# Altium PCB PCB1.PcbDoc
Units mm, origin at the board's own origin, x right, y up, seen from the top; angles counter-clockwise.
Board outline 61 x 70 mm, 2 copper layers (Top Layer, Bottom Layer); 89 components, 64 nets, 292 pads, 22 vias.
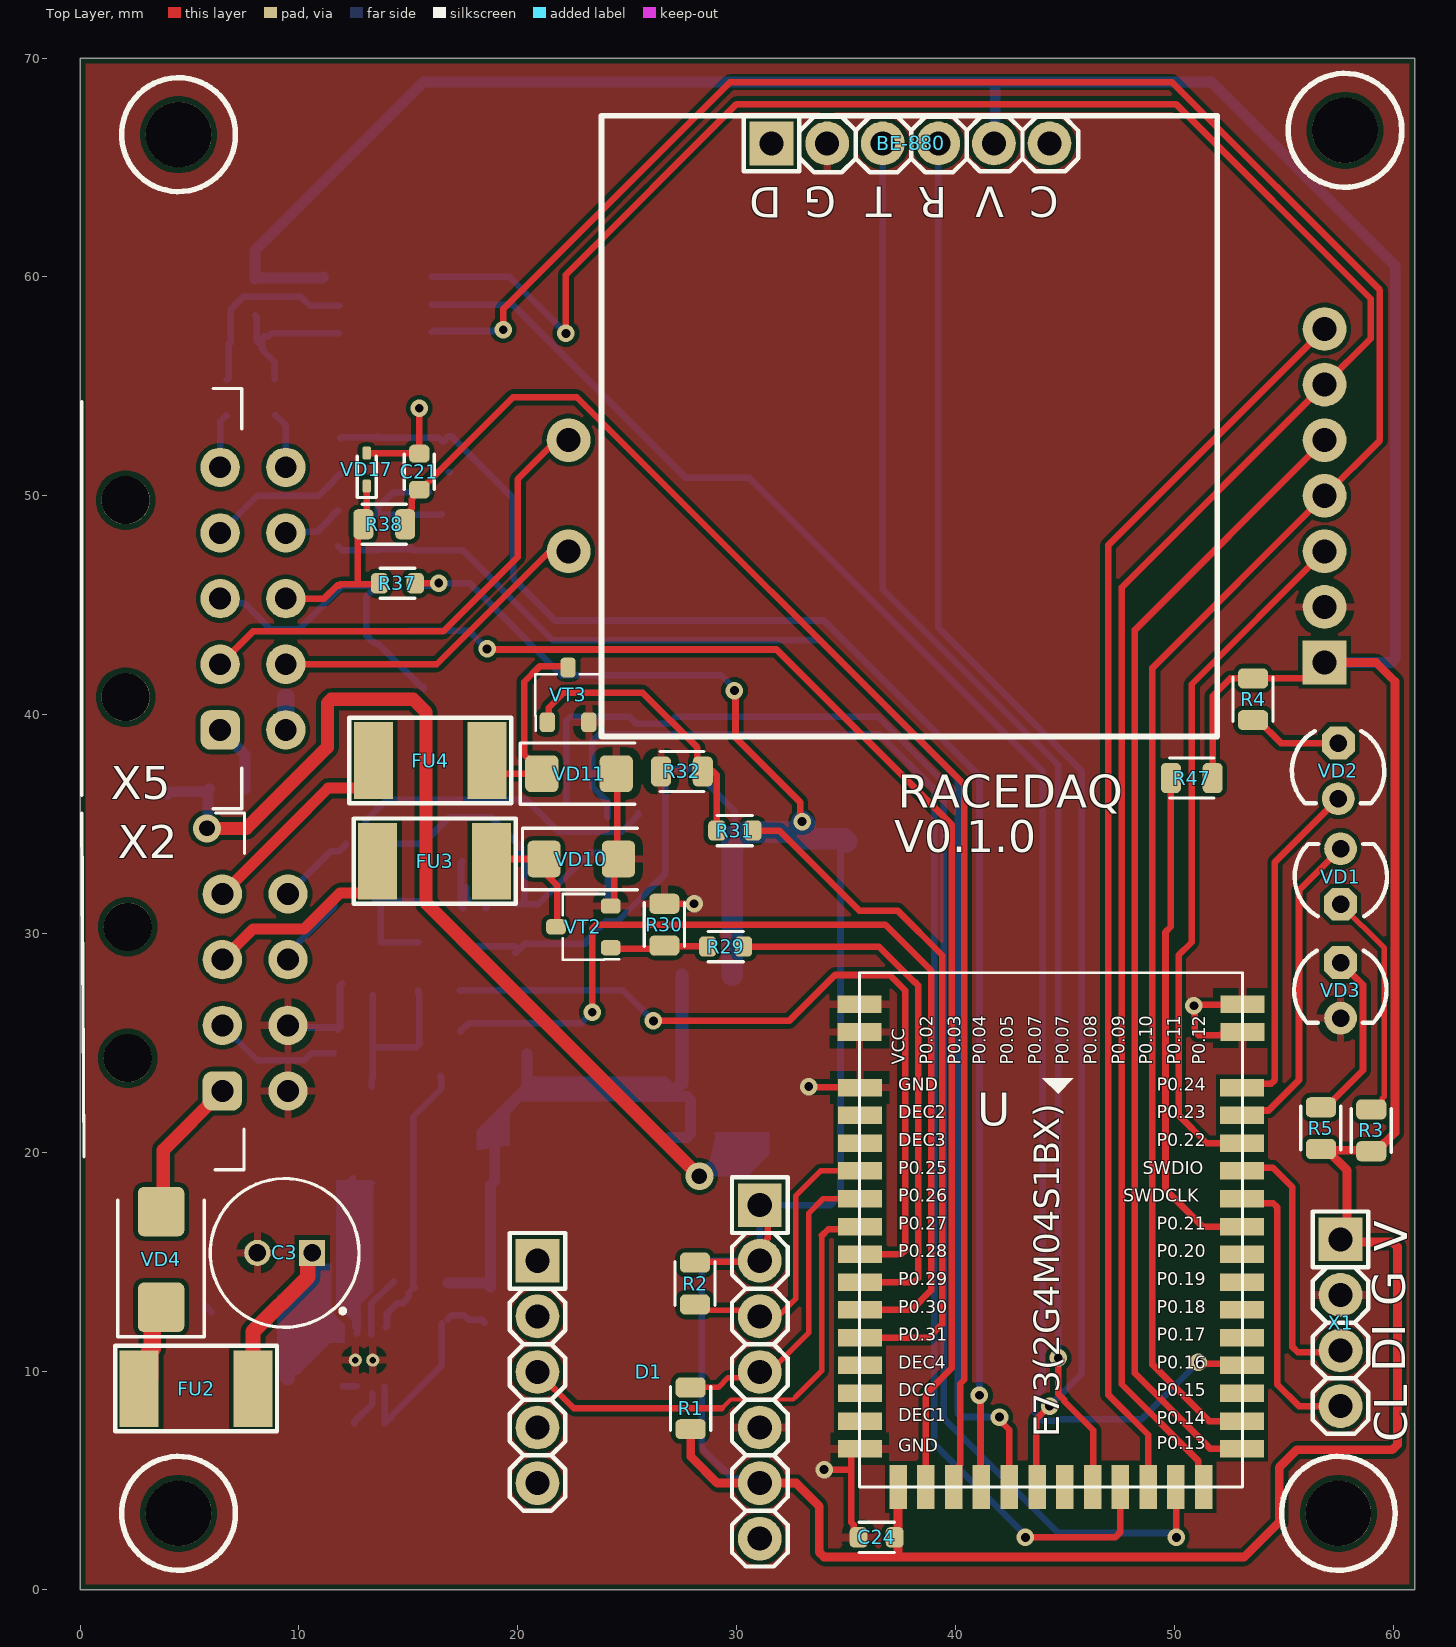
[diagram p0: Top Layer view]
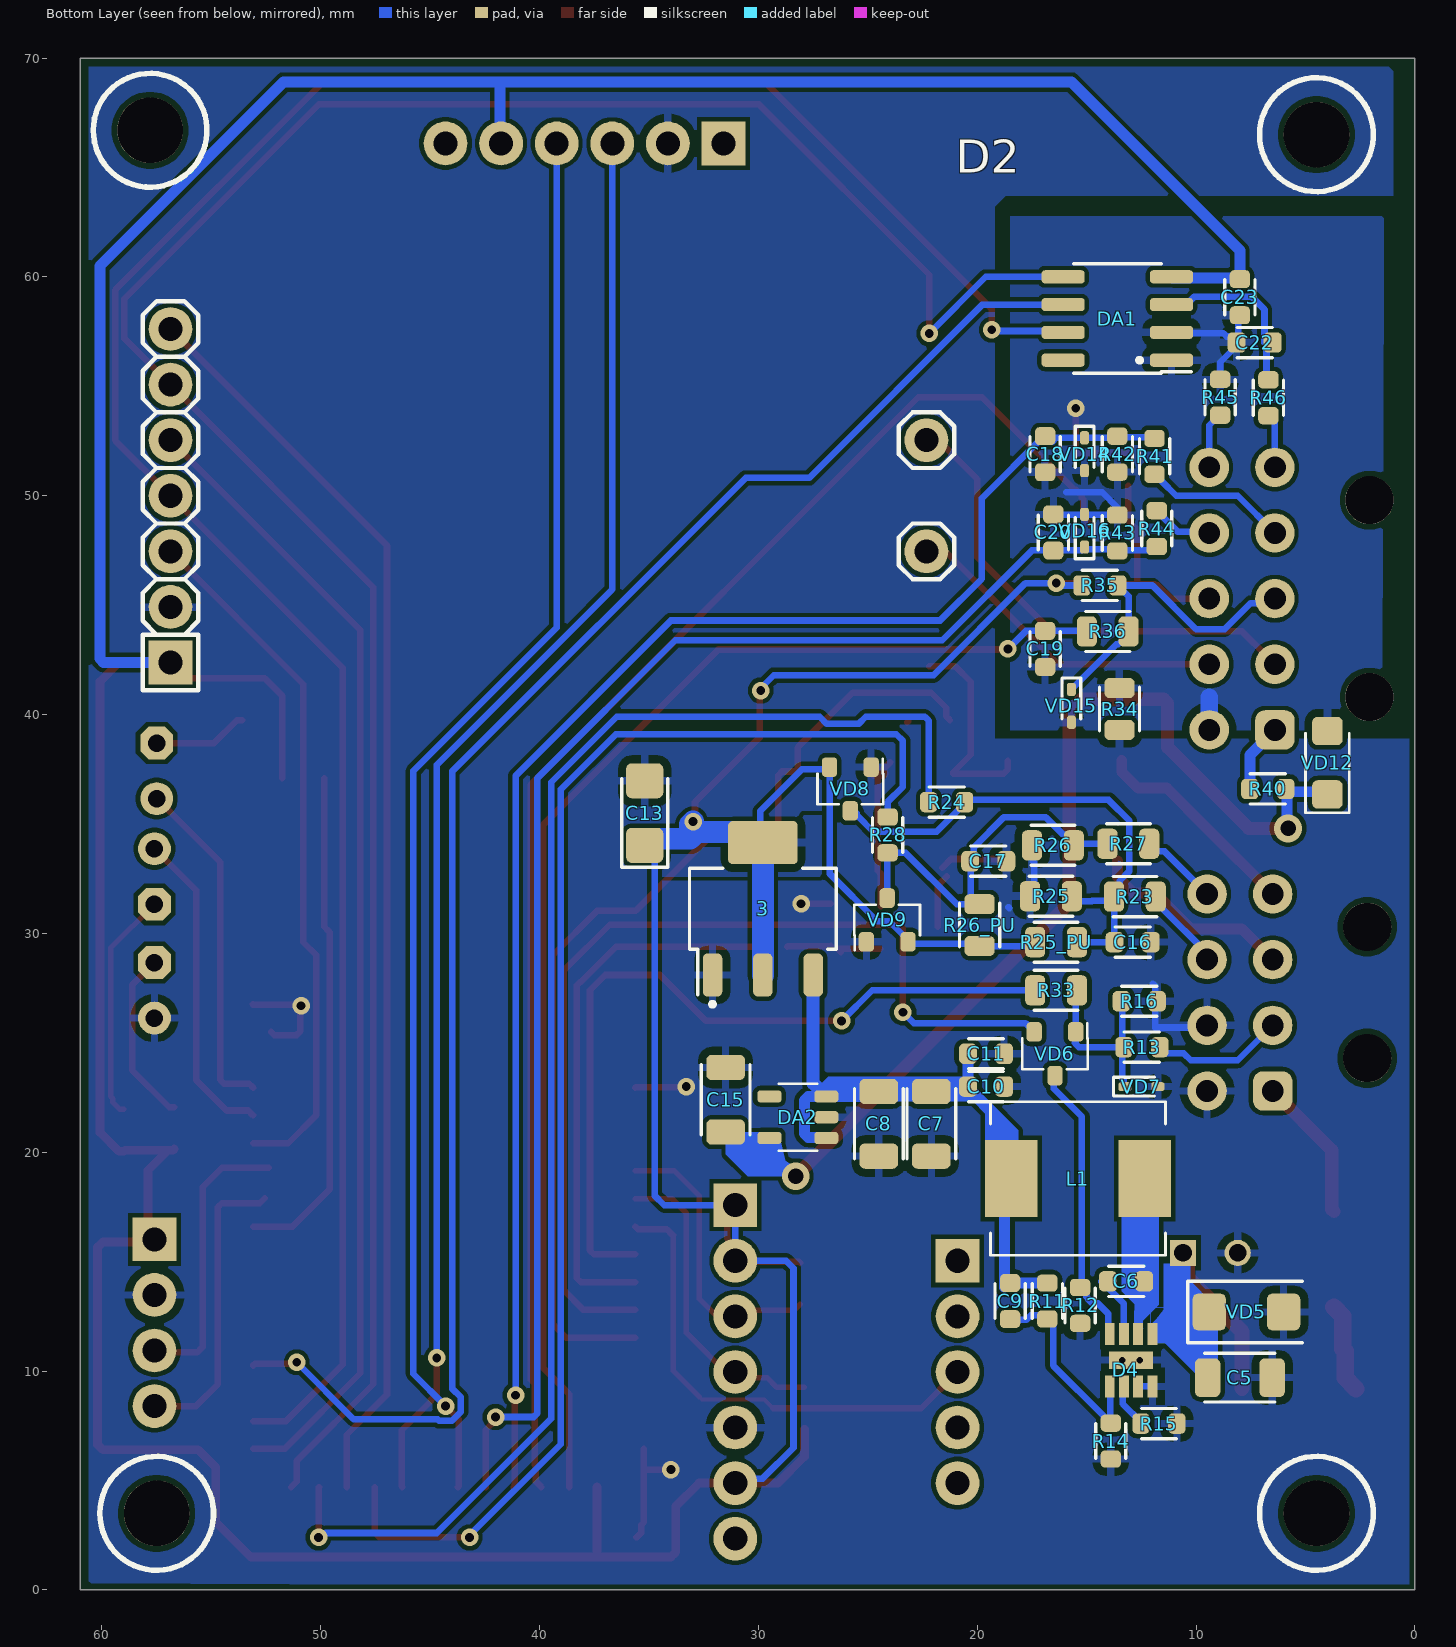
[diagram p1: Bottom Layer view, seen from below]
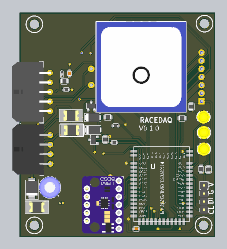
[diagram p2: 3D render of the assembled board from above, using the file's embedded part models]
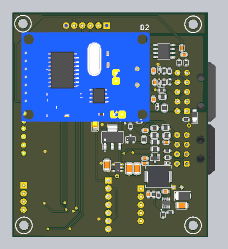
[diagram p3: 3D render of the assembled board from below, using the file's embedded part models]

## Layer stack, top to bottom
Top Solder: solder mask 0.0102, Solder Resist, Dk 3.5
Top Layer: signal copper 0.0356
Dielectric 1: dielectric 0.32, FR-4, Dk 4.8
Bottom Layer: signal copper 0.0356
Bottom Solder: solder mask 0.0102, Solder Resist, Dk 3.5

## Board outline
0,0 0,70 61,70 61,0

## Design rules (kind name [scope] priority, off if disabled: settings)
AcuteAngle [All] p1: minimum=3.50000000000000E+0001 checktracksonly=FALSE
BoardOutlineClearance "BoardOutlineClearance 1" [All] p1: gap=0.25 ignorepadtopadclearanceinfootprint=FALSE except(0: Arc-SplitContinuation Track-SplitContinuation SMDPad-SplitContinuation THPad-SplitContinuation Via-SplitContinuation Fill-SplitContinuation Poly-SplitContinuation Region-SplitContinuation Text-SplitContinuation) // Milling
BoardOutlineClearance "BoardOutlineClearance 2" [All] p2: gap=0.4 ignorepadtopadclearanceinfootprint=FALSE except(0: Arc-SplitContinuation Track-SplitContinuation SMDPad-SplitContinuation THPad-SplitContinuation Via-SplitContinuation Fill-SplitContinuation Poly-SplitContinuation Region-SplitContinuation Text-SplitContinuation) // V-Cut
Clearance "Clearance 3 Oz" [All] p1 off: gap=0.35 ignorepadtopadclearanceinfootprint=FALSE except(0.25: Arc-Hole Track-Hole SMDPad-Hole THPad-Hole Via-Hole Fill-Hole Poly-Hole Region-Hole Text-Hole)
Clearance "Clearance 2 Oz" [All] p2 off: gap=0.3 ignorepadtopadclearanceinfootprint=FALSE except(0.25: Arc-Hole Track-Hole SMDPad-Hole THPad-Hole Via-Hole Fill-Hole Poly-Hole Region-Hole Text-Hole)
Clearance "Clearance-1 1 Oz" [All] p3 off: gap=0.2 ignorepadtopadclearanceinfootprint=FALSE except(0.25: Arc-Hole Track-Hole SMDPad-Hole THPad-Hole Via-Hole Fill-Hole Poly-Hole Region-Hole Text-Hole) // Standart
Clearance "Clearance-2 1 Oz" [All] p4 off: gap=0.15 ignorepadtopadclearanceinfootprint=FALSE except(0.2: Arc-Fill Arc-Poly Track-Fill Track-Poly SMDPad-Fill SMDPad-Poly THPad-Fill THPad-Poly Via-Fill Via-Poly Fill-Fill Fill-Poly Poly-Poly; 0.25: Arc-Hole Track-Hole SMDPad-Hole THPad-Hole Via-Hole Fill-Hole Poly-Hole Region-Hole Text-Hole) // Advance
Clearance "Clearance-1 1/2 Oz" [All] p5: gap=0.125 ignorepadtopadclearanceinfootprint=FALSE except(0.2: Arc-Fill Arc-Poly Track-Fill Track-Poly SMDPad-SMDPad SMDPad-Fill SMDPad-Poly THPad-Fill THPad-Poly Via-Fill Via-Poly Fill-Fill Fill-Poly Poly-Poly Poly-Region Poly-Text; 0.25: Arc-Hole Track-Hole SMDPad-Hole THPad-Hole Via-Hole Fill-Hole Poly-Hole Region-Hole Text-Hole) // Standart
Clearance "Clearance-2 1/2 Oz" [All] p6 off: gap=0.1 ignorepadtopadclearanceinfootprint=FALSE except(0.15: Arc-Fill Arc-Poly Track-Fill Track-Poly SMDPad-SMDPad SMDPad-Fill SMDPad-Poly THPad-Fill THPad-Poly Via-Fill Via-Poly Fill-Fill Fill-Poly Poly-Poly Poly-Region Poly-Text; 0.25: Arc-Hole Track-Hole SMDPad-Hole THPad-Hole Via-Hole Fill-Hole Poly-Hole Region-Hole Text-Hole) // Advance
DiffPairsRouting "DiffPairsRouting 1 Oz" [All] p1: maxlimit=0.254 minlimit=0.2 mostfreqgap=0.254 toplayer_minwidth=0.2 toplayer_maxwidth=0.381 toplayer_prefwidth=0.381 bottomlayer_minwidth=0.2 bottomlayer_maxwidth=0.381 bottomlayer_prefwidth=0.381 maxuncoupledlength=12.7
DiffPairsRouting "DiffPairsRouting 1/2 Oz" [All] p2: maxlimit=0.254 minlimit=0.1 mostfreqgap=0.254 toplayer_minwidth=0.1 toplayer_maxwidth=0.381 toplayer_prefwidth=0.381 bottomlayer_minwidth=0.1 bottomlayer_maxwidth=0.381 bottomlayer_prefwidth=0.381 maxuncoupledlength=12.7
HoleSize "Minimum HoleSize" [IsPad] p1 off: absolutevalues=TRUE maxlimit=5.9 minlimit=0.6 maxpercent=80.000 minpercent=20.000
HoleSize "Minimum HoleSize VIA 1" [IsVia] p2: absolutevalues=TRUE maxlimit=5.9 minlimit=0.3 maxpercent=80.000 minpercent=20.000 // Standart
HoleSize "Minimum HoleSize VIA 2" [IsVia] p3 off: absolutevalues=TRUE maxlimit=5.9 minlimit=0.2 maxpercent=80.000 minpercent=20.000 // Advance
HoleToHoleClearance Hole2HoleClearance [All] p1: gap=0.25 allowstackedmicrovias=FALSE
MinimumAnnularRing "Minimum AR VIA Standart" [IsVia] p1: minimumring=0.15
MinimumAnnularRing "Minimum AR PAD Standart" [IsPAD] p2: minimumring=0.2
MinimumAnnularRing "Minimum AR VIA Advance" [IsVia] p3 off: minimumring=0.1
MinimumAnnularRing "Minimum AR PAD Advance" [IsPAD] p4 off: minimumring=0.15
MinimumSolderMaskSliver "SolderMask Bridge Standart" [All] p1: minsoldermaskwidth=0.15 // All Masks
MinimumSolderMaskSliver "SolderMask Bridge Advance" [All] p2: minsoldermaskwidth=0.1 // Mask LDI
PlaneClearance "PlaneClearance 3 Oz" [All] p1: clearance=0.35
PlaneClearance "PlaneClearance 2 Oz" [All] p2: clearance=0.3
PlaneClearance "PlaneClearance 1 Oz" [All] p3: clearance=0.2
PlaneClearance "PlaneClearance-1 1/2 Oz" [All] p4: clearance=0.2 // Standart
PlaneClearance "PlaneClearance-2 1/2 Oz" [All] p5: clearance=0.15 // Advance
PlaneConnect "TermalConnect 3 Oz" [All] p1: planeconnectstyle=Relief reliefexpansion=0.2 reliefentries=4 reliefconductorwidth=0.35 reliefairgap=0.35 // Standart
PlaneConnect "TermalConnect 2 Oz" [All] p2: planeconnectstyle=Relief reliefexpansion=0.2 reliefentries=4 reliefconductorwidth=0.3 reliefairgap=0.3 // Standart
PlaneConnect "TermalConnect-1 1 Oz" [All] p3: planeconnectstyle=Relief reliefexpansion=0.2 reliefentries=4 reliefconductorwidth=0.2 reliefairgap=0.2 // Standart
PlaneConnect "TermalConnect-2 1 Oz" [All] p4: pad.planeconnectstyle=Relief pad.reliefexpansion=0.15 pad.reliefentries=4 pad.reliefconductorwidth=0.2 pad.reliefairgap=0.2 via.planeconnectstyle=Direct via.reliefexpansion=0.15 via.reliefentries=4 via.reliefconductorwidth=0.15 via.reliefairgap=0.15 // Advance
PlaneConnect "TermalConnect-1 1/2 Oz" [All] p5: planeconnectstyle=Relief reliefexpansion=0.2 reliefentries=4 reliefconductorwidth=0.2 reliefairgap=0.2 // Standart
PlaneConnect "TermalConnect-2 1/2 Oz" [All] p6: pad.planeconnectstyle=Relief pad.reliefexpansion=0.15 pad.reliefentries=4 pad.reliefconductorwidth=0.15 pad.reliefairgap=0.15 via.planeconnectstyle=Direct via.reliefexpansion=0.15 via.reliefentries=4 via.reliefconductorwidth=0.15 via.reliefairgap=0.15 // Advance
PolygonConnect "PolygonConnect 3 Oz" [All] p1: thpad.connectstyle=Relief thpad.reliefconductorwidth=0.35 thpad.reliefentries=4 thpad.polygonreliefangle="90 Angle" thpad.airgapwidth=0.35 smdpad.connectstyle=Relief smdpad.reliefconductorwidth=0.35 smdpad.reliefentries=4 smdpad.polygonreliefangle="90 Angle" smdpad.airgapwidth=0.35 via.connectstyle=Direct via.reliefconductorwidth=0.254 via.reliefentries=4 via.polygonreliefangle="90 Angle" via.airgapwidth=0.254
PolygonConnect "PolygonConnect 2 Oz" [All] p2: thpad.connectstyle=Relief thpad.reliefconductorwidth=0.3 thpad.reliefentries=4 thpad.polygonreliefangle="90 Angle" thpad.airgapwidth=0.3 smdpad.connectstyle=Relief smdpad.reliefconductorwidth=0.3 smdpad.reliefentries=4 smdpad.polygonreliefangle="90 Angle" smdpad.airgapwidth=0.3 via.connectstyle=Direct via.reliefconductorwidth=0.254 via.reliefentries=4 via.polygonreliefangle="90 Angle" via.airgapwidth=0.254
PolygonConnect "PolygonConnect-1 1 Oz" [All] p3: thpad.connectstyle=Relief thpad.reliefconductorwidth=0.2 thpad.reliefentries=4 thpad.polygonreliefangle="90 Angle" thpad.airgapwidth=0.2 smdpad.connectstyle=Relief smdpad.reliefconductorwidth=0.2 smdpad.reliefentries=4 smdpad.polygonreliefangle="90 Angle" smdpad.airgapwidth=0.2 via.connectstyle=Direct via.reliefconductorwidth=0.254 via.reliefentries=4 via.polygonreliefangle="90 Angle" via.airgapwidth=0.254 // Standart
PolygonConnect "PolygonConnect-2 1 Oz" [All] p4: thpad.connectstyle=Relief thpad.reliefconductorwidth=0.15 thpad.reliefentries=4 thpad.polygonreliefangle="90 Angle" thpad.airgapwidth=0.15 smdpad.connectstyle=Relief smdpad.reliefconductorwidth=0.15 smdpad.reliefentries=4 smdpad.polygonreliefangle="90 Angle" smdpad.airgapwidth=0.15 via.connectstyle=Direct via.reliefconductorwidth=0.254 via.reliefentries=4 via.polygonreliefangle="90 Angle" via.airgapwidth=0.254 // Advance
PolygonConnect "PolygonConnect-1 1/2 Oz" [All] p5: thpad.connectstyle=Relief thpad.reliefconductorwidth=0.15 thpad.reliefentries=4 thpad.polygonreliefangle="90 Angle" thpad.airgapwidth=0.2 smdpad.connectstyle=Relief smdpad.reliefconductorwidth=0.2 smdpad.reliefentries=4 smdpad.polygonreliefangle="90 Angle" smdpad.airgapwidth=0.2 via.connectstyle=Direct via.reliefconductorwidth=0.254 via.reliefentries=4 via.polygonreliefangle="90 Angle" via.airgapwidth=0.254 // Standart
PolygonConnect "PolygonConnect-2 1/2 Oz" [All] p6: thpad.connectstyle=Relief thpad.reliefconductorwidth=0.125 thpad.reliefentries=4 thpad.polygonreliefangle="90 Angle" thpad.airgapwidth=0.15 smdpad.connectstyle=Relief smdpad.reliefconductorwidth=0.125 smdpad.reliefentries=4 smdpad.polygonreliefangle="90 Angle" smdpad.airgapwidth=0.15 via.connectstyle=Direct via.reliefconductorwidth=0.254 via.reliefentries=4 via.polygonreliefangle="90 Angle" via.airgapwidth=0.254 // Advance
RoutingCorners [All] p1 off: cornerstyle=45-Degree minsetback=2.54 maxsetback=2.54
RoutingVias [All] p1: holewidth=0.3 width=0.6 viastyle="Through Hole" minholewidth=0.2 minwidth=0.4 maxholewidth=5.9 maxwidth=6.4
SilkToSilkClearance Silk2SilkClearance [All] p1 off: silktosilkclearance=0.15
SilkToSolderMaskClearance Silk2SolderMaskClearance [IsPad] p1 off: minsilkscreentomaskgap=0.15 clearancetoexposedcopper=TRUE
SolderMaskExpansion SolderMaskExpansion-1 [All] p1: expansion=0.05 istentingtop=FALSE // Standart
SolderMaskExpansion "SolderMaskExpansion LDI" [All] p2 off: expansion=0.025 istentingtop=FALSE // Advance
UnRoutedNet [All] p1: checkbadconnections=TRUE
Width "Width 3 Oz" [All] p1 off: maxlimit=10 minlimit=0.35 preferedwidth=0.4 checkconnectedcopper=TRUE
Width "Width 2 Oz" [All] p2 off: maxlimit=10 minlimit=0.3 preferedwidth=0.35 minimp=50.000000 maximp=50.000000 favimp=50.000000 checkconnectedcopper=TRUE
Width "Width 1 Oz" [All] p3 off: maxlimit=10 minlimit=0.15 preferedwidth=0.2 checkconnectedcopper=TRUE
Width "Width 1/2 Oz" [All] p4: maxlimit=10 minlimit=0.1 preferedwidth=0.125 checkconnectedcopper=TRUE
20 further rules are at their usual default settings.

## Classes and differential pairs
component class RaceDAQ_POWER: 3 C3 C5 C6 C7 C8 C9 C10 C11 C13 C15 D4 DA2 FU2 L1 R11 R12 R13 R14 R15 R16 R33 VD4 VD5 VD6 VD7 X2
component class RaceDAQ_MCU: BE-880 C24 D1 D2 R1 R2 R3 R4 R5 R47 U VD1 VD2 VD3 X1
component class RaceDAQ_IN_OUT: C16 C17 FU3 FU4 R23 R24 R25 R25_PU R26 R26_PU R27 R28 R29 R30 R31 R32 VD8 VD9 VD10 VD11 VT2 VT3
component class RaceDAQ_ANALOG: C18 C19 C20 C21 C22 C23 DA1 R34 R35 R36 R37 R38 R40 R41 R42 R43 R44 R45 R46 VD12 VD14 VD15 VD16 VD17 X5

## Components (designator, comment, footprint, x,y, rotation, side; value= is the part's Value field where it differs from the comment)
3 "LM1117-3.3" SOT230P700X180-4L40N 29.8,31.125 r180 bottom
BE-880 "" GPS:BE880 37.95,66.1 r180 top locked
C3 "100uF" CAPPRD250W50D680H1250 9.35,15.4 r180 top
C5 "10uF" CAPC3216X130L50N 8,9.7 r180 bottom
C6 "0.1uF" CAPC1608X90L25N 13.2,14.1 r180 bottom
C7 "10uF" CAPC3216X130L50N 22.1,21.3 r270 bottom
C8 "10uF" CAPC3216X130L50N 24.5,21.3 r270 bottom
C9 "33пФ" CAPC1608X90L25N 18.5,13.2 r270 bottom
C10 "33пФ" CAPC1608X90L25N 19.6,23 r180 bottom
C11 "0.1uF" CAPC1608X90L25N 19.6,24.5 r180 bottom
C13 "22uF" CAPPM3216X180 35.2,35.5 r270 bottom
C15 "10uF" CAPC3216X130L50N 31.5,22.4 r90 bottom
C16 "4.7нФ" CAPC1608X90L25N 12.9,29.6 r0 bottom
C17 "4.7нФ" CAPC1608X90L25N 19.5,33.3 r180 bottom
C18 "0.1uF" CAPC1608X90L25N 16.9,51.9 r270 bottom
C19 "0.1uF" CAPC1608X90L25N 16.9,43 r90 bottom
C20 "0.1uF" CAPC1608X90L25N 16.525,48.325 r270 bottom
C21 "0.1uF" CAPC1608X90L25N 15.5,51.1 r270 top
C22 "0.1uF" CAPC1608X90L25N 7.325,57 r0 bottom
C23 "0.1uF" CAPC1608X90L25N 8,59.075 r90 bottom
C24 "0.1uF" CAPC1608X90L25N 36.4,2.4 r0 top
D1 "GY-LSM6DS3" AXL:LSM6DS3 25.98,9.325 r270 top
D2 "MCP2515_CAN" MDL:MCP2515 38.2,50 r180 bottom locked
D4 "DC/DC buck converter, input 4...60V, 2.1MHz, output 0.765...55V, 0.6A, -40...+125°C, SOT23-8" 8-SOT 12.975,10.5 r90 bottom
DA1 "MAX6675ISA+" SOIC127P600X175-8L87N 13.6,58.1 r90 bottom
DA2 "TPL803250-S5TR" SOT95P280X145-5L30N 28.2,21.6 r180 bottom
FU2 "JK-mSMD075-33" "FUSE: 1812" 5.3,9.2 r0 top
FU3 "JK-mSMD075-33" "FUSE: 1812" 16.2,33.3 r0 top
FU4 "JK-mSMD075-33" "FUSE: 1812" 16,37.9 r0 top
L1 "10мкГн" MPH0630 15.4,18.8 r0 bottom
R1 "5.1K" RESC2012X60L35N 27.9,8.3 r270 top
R2 "5.1K" RESC2012X60L35N 28.1,14 r90 top
R3 "820R" RESC2012X60L35N 59,21 r90 top
R4 "820R" RESC2012X60L35N 53.6,40.7 r270 top
R5 "820R" RESC2012X60L35N 56.7,21.1 r90 top
R11 "100K" RESC1608X55L25N 16.8,13.2 r270 bottom
R12 "100K" RESC1608X55L25N 15.3,13 r270 bottom
R13 "100K" RESC1608X55L25N 12.48,24.8 r0 bottom
R14 "12K" RESC1608X55L25N 13.9,6.8 r270 bottom
R15 "100K" RESC1608X55L25N 11.7,7.6 r180 bottom
R16 "33K" RESC1608X55L25N 12.6,26.9 r180 bottom
R23 "10K" RESC2012X60L35N 12.798,31.683 r0 bottom
R24 "1K" RESC1608X55L25N 21.4,36 r0 bottom
R25 "10K" RESC2012X60L35N 16.63,31.698 r0 bottom
R25_PU "10K" RESC2012X60L35N 16.4,29.6 r180 bottom
R26 "10K" RESC2012X60L35N 16.544,34.025 r180 bottom
R26_PU "10K" RESC2012X60L35N 19.895,30.382 r90 bottom
R27 "10K" RESC2012X60L35N 13.1,34.1 r0 bottom
R28 "1K" RESC1608X55L25N 24.1,34.5 r90 bottom
R29 "1K" RESC1608X55L25N 29.5,29.4 r0 top
R30 "10K" RESC2012X60L35N 26.7,30.4 r270 top
R31 "1K" RESC1608X55L25N 29.92,34.7 r0 top
R32 "10K" RESC2012X60L35N 27.5,37.4 r0 top
R33 "10K" RESC2012X60L35N 16.4,27.4 r180 bottom
R34 "0" RESC2012X60L35N 13.5,40.255 r90 bottom
R35 "1K 0.1%" RESC1608X55L25N 14.4,45.9 r0 bottom
R36 "10K" RESC2012X60L35N 14.039,43.8 r0 bottom
R37 "1K 0.1%" RESC1608X55L25N 14.5,46 r0 top
R38 "10K" RESC2012X60L35N 13.9,48.7 r0 top
R40 "1Ом" RESC1608X55L25N 6.726,36.6 r180 bottom
R41 "5.1K 0.1%" RESC1608X55L25N 11.9,51.8 r90 bottom
R42 "10K 0.1%" RESC1608X55L25N 13.6,51.9 r90 bottom
R43 "10K 0.1%" RESC1608X55L25N 13.6,48.3 r270 bottom
R44 "5.1K 0.1%" RESC1608X55L25N 11.8,48.5 r270 bottom
R45 "22Ом" RESC1608X55L25N 8.9,54.5 r90 bottom
R46 "22Ом" RESC1608X55L25N 6.696,54.476 r90 bottom
R47 "10K" RESC2012X60L35N 50.8,37.1 r180 top
U "E73-2G4M04S1B" PE73(2G4M04S1BX) 35.615,4.7 r0 top locked
VD1 "LED, Green, *, *, *, -55...+150°C" "DIODE: LED3MM_Y" 57.6,32.6 r90 top
VD2 "LED, Green, *, *, *, -55...+150°C" "DIODE: LED3MM_Y" 57.5,37.43 r270 top
VD3 "LED, Green, *, *, *, -55...+150°C" "DIODE: LED3MM_Y" 57.6,27.4 r270 top
VD4 "SS14" DIOM5436X247N 3.7,15.1 r90 top
VD5 "SMAJ15-A" DIOM5126X229 7.7,12.7 r180 bottom
VD6 "BAT54C" SOT95P240X110-3L16 16.45,24.5 r90 bottom
VD7 "PESD3V3L1B" SODFL1608X65N 12.5,23 r180 bottom
VD8 "BAT54S" SOT95P240X110-3L16 25.8,36.6 r90 bottom
VD9 "BAT54S" SOT95P240X110-3L16 24.12,30.614 r270 bottom
VD10 "SMAJ24CA" DIOM5126X229 22.9,33.4 r0 top
VD11 "SMAJ24CA" DIOM5126X229 22.8,37.3 r0 top
VD12 "SMF5.0A" SODFL3617X110 4,37.8 r90 bottom
VD14 "PESD3V3L1B" SODFL1608X65N 15.1,51.9 r270 bottom
VD15 "PESD3V3L1B" SODFL1608X65N 15.7,40.4 r270 bottom
VD16 "PESD3V3L1B" SODFL1608X65N 15.1,48.4 r90 bottom
VD17 "PESD3V3L1B" SODFL1608X65N 13.1,51.2 r90 top
VT2 "WM10N33M" SOT95P240X110-3L10 23,30.3 r0 top
VT3 "WM10N33M" SOT95P240X110-3L10 22.3,40.9 r270 top
X1 "Connector, 4pin, 2.54mm, 500VAC, 3A" "CON: PLS-4" 57.6,12.21 r270 top
X2 "43045-0800" 43045-0800 2.18,28.8 r270 top
X5 "43045-1000 (Micro-Fit 2x5 RA)" 43045-1000 2.08,45.3 r270 top

## Footprints (in the part's own frame and the unit in brackets; to place one, negate y for a bottom-side part, rotate by r counter-clockwise, add the part's x,y. Pads: shape width x height; smd on the part's side, far side on the other; paste and mask are expansions set on the pad)
8-SOT [mm] "3x2 mm, pitch 0.65 mm, power pad"
  round 0.6 hole 0.3: 0(0,-0.4) 0(0,0.4)
  rect 0.8x2 smd: 0(0,0)
  rect 1x0.45 smd mask+0.05: 1(-1.2,0.975) 2(-1.2,0.325) 3(-1.2,-0.325) 4(-1.2,-0.975) 5(1.2,-0.975) 6(1.2,-0.325) 7(1.2,0.325) 8(1.2,0.975)
  round 0.5 on Mech1: ""(-2.1,1.45)
  round 0.5 on Bottom Overlay: ""(-2.1,1.45)
  body extent -1.4,-1.45 1.4,1.45, height 1
43045-0800 [mm] "43045-0800"
  round 2.2 hole 2.2 unplated: 0(-1.5,0) 0(4.5,0)
  rrect50% 1.8x1.8 hole 1: 1(6,4.32)
  round 1.8 hole 1: 2(3,4.32) 3(0,4.32) 4(-3,4.32) 5(6,7.32) 6(3,7.32) 7(0,7.32) 8(-3,7.32)
  silkscreen extent -6.7,-2.1 9.6,5.33, body extent -6.58,-4.6 9.58,7.64, height 8.76
43045-1000 [mm] "43045-1200"
  round 2.2 hole 2.2 unplated: 0(-4.5,0) 0(4.5,0)
  rrect50% 1.8x1.8 hole 1: 1(6,4.32)
  round 1.8 hole 1: 2(3,4.32) 3(0,4.32) 4(-3,4.32) 5(-6,4.32) 6(6,7.32) 7(3,7.32) 8(0,7.32) 9(-3,7.32) 10(-6,7.32)
  silkscreen extent -9.6,-2 9.6,5.31, body extent -9.58,-4.6 9.57,7.64, height 8.83
AXL:LSM6DS3 [mm]
  rect 2x2 hole 1.1: 1(-8.255,5.08) 12(-5.715,-5.08)
  round 2 hole 1.1: 2(-5.715,5.08) 3(-3.175,5.08) 4(-0.635,5.08) 5(1.905,5.08) 6(4.445,5.08) 7(6.985,5.08) 8(4.445,-5.08) 9(1.905,-5.08) 10(-0.635,-5.08) 11(-3.175,-5.08)
  silkscreen extent -9.53,-6.35 8.26,6.35, body extent -9.63,-6.52 8.37,6.48, height 8.54
CAPC1608X90L25N [mm] "Capacitor, Chip; 1.60 mm L X 0.80 mm W X 0.90 mm H body"
  rrect51% 0.82x0.93 smd: 1(-0.825,0) 2(0.825,0)
  silkscreen extent -0.8,-0.69 0.8,0.69, body extent -0.8,-0.4 0.8,0.4, height 0.9
CAPC3216X130L50N [mm] "Capacitor, Chip; 3.20 mm L X 1.60 mm W X 1.30 mm H body"
  rrect43% 1.16x1.77 smd: 1(-1.475,0) 2(1.475,0)
  silkscreen extent -1.6,-1.11 1.6,1.11, body extent -1.6,-0.8 1.6,0.8, height 1.3
CAPPM3216X180 [mm] "Capacitor, Polarized, Molded Body; 3.20 mm L X 1.60 mm W X 1.80 mm H body"
  rrect31% 1.6x1.7 smd paste-0.05: 1(1.475,0) 2(-1.475,0)
  silkscreen extent -1.58,-1.05 2.48,1.06, body extent -1.6,-0.8 1.6,0.8, height 1.8
CAPPRD250W50D680H1250 [mm] "Capacitor, Polarized, Radial (Electrolytic); 2.50 mm C X 6.80 mm Dia X 12.50 mm H body"
  rect 1.2x1.2 hole 0.8 paste-1.2: 1(-1.25,0)
  round 1.2 hole 0.8 paste-1.2: 2(1.25,0)
  silkscreen extent -3.4,-3.4 3.4,3.4, body extent -3.4,-3.4 3.41,3.4, height 12.51
"CON: PLS-4" [mm] "PLS-40 4 pin header"
  rect 2x2 hole 1.1: 1(-3.81,0)
  round 2 hole 1.1: 2(-1.27,0) 3(1.27,0) 4(3.81,0)
  silkscreen extent -5.08,-1.27 5.08,1.27, body extent -5.08,-1.27 5.08,1.27, height 8.54
"DIODE: LED3MM_Y" [mm] "Yellow Leaded Led, 3 mm"
  oct 1.5x1.5 hole 0.8: 1(-1.27,0)
  round 1.5 hole 0.8: 2(1.27,0)
  silkscreen extent -1.82,-2.13 1.48,2.1, body extent -2,-2 2,2, height 12
DIOM5126X229 [mm] "Diode, Molded Body; 5.105 mm L X 2.665 mm W X 2.29 mm H body"
  rrect33% 1.52x1.68 smd: A(1.7,0) C(-1.7,0)
  silkscreen extent -2.69,-1.4 2.56,1.4, body extent -2.55,-1.33 2.55,1.33, height 2.29
DIOM5436X247N [mm] "Diode, Molded Body; 5.405 mm L X 3.625 mm W X 2.47 mm H body"
  rrect24% 2.25x2.12 smd: A(2.185,0) C(-2.185,0)
  silkscreen extent -3.53,-1.98 2.71,1.98, body extent -2.7,-1.81 2.7,1.81, height 2.47
"FUSE: 1812" [mm]
  rect 1.78x3.5 smd: 1(-2.6,0) 2(2.6,0)
  silkscreen extent -3.7,-1.95 3.7,1.95, body extent -2.41,-1.61 2.41,1.61, height 1.32
GPS:BE880 [mm]
  rect 2x2 hole 1.1: 1(6.35,0)
  round 2 hole 1.1: 2(3.81,0) 3(1.27,0) 4(-1.27,0) 5(-3.81,0) 6(-6.35,0)
  silkscreen extent -14.02,-1.27 14.12,27.1, body extent -14,-1.27 14,27.06, height 11.5
MDL:MCP2515 [mm]
  round 2 hole 1.1: 1(-18.669,7.62) 2(-18.669,5.08) 3(-18.669,2.54) 4(-18.669,0) 5(-18.669,-2.54) 6(-18.669,-5.08) 8(15.875,-2.54) 9(15.875,2.54)
  rect 2x2 hole 1.1: 7(-18.669,-7.62)
  silkscreen extent -19.94,-8.89 17.14,8.89, body extent -20,-14 20,14, height 12.16
MPH0630 [mm] "Inductor, Dual Flat No-Lead (DFN 2 Pin); 2 pin, 9.80 mm L X 8.90 mm W X 5.00 mm H body"
  rect 2.4x3.5 smd: 1(-3.05,0) 2(3.05,0)
  silkscreen extent -4,-3.5 4,3.5, body extent -3.5,-3.3 3.5,3.3, height 3
PE73(2G4M04S1BX) [mm] "28.7mm*17.5mm*2.60mm-S"
  rect 2x0.8 smd: 0(0,22.065) 1(0,20.795) 2(0.02,18.255) 3(0.02,16.985) 4(0.02,15.715) 5(0.02,14.445) 6(0.02,13.175) 7(0.02,11.905) 8(0.02,10.635) 9(0.02,9.365) 10(0.02,8.095) 11(0.02,6.825) 12(0.02,5.555) 13(0.02,4.285) 14(0.02,3.015) 15(0.02,1.745) 28(17.48,1.745) 29(17.48,3.015) 30(17.48,4.285) 31(17.48,5.555) 32(17.48,6.825) 33(17.48,8.095) 34(17.48,9.365) 35(17.48,10.635) 36(17.48,11.905) 37(17.48,13.175) 38(17.48,14.445) 39(17.48,15.715) 40(17.48,16.985) 41(17.48,18.255) 42(17.5,20.795) 43(17.5,22.065)
  rect 0.8x2 smd: 16(1.765,0) 17(3.035,0) 18(4.305,0) 19(5.575,0) 20(6.845,0) 21(8.115,0) 22(9.385,0) 23(10.655,0) 24(11.925,0) 25(13.195,0) 26(14.465,0) 27(15.735,0)
  silkscreen extent 0,0 17.5,23.5
RESC1608X55L25N [mm] "Resistor, Chip; 1.60 mm L X 0.80 mm W X 0.55 mm H body"
  rrect51% 0.79x0.93 smd: 1(-0.82,0) 2(0.82,0)
  silkscreen extent -0.8,-0.69 0.8,0.69, body extent -0.8,-0.4 0.8,0.4, height 0.55
RESC2012X60L35N [mm] "Resistor, Chip; 2.00 mm L X 1.25 mm W X 0.60 mm H body"
  rrect50% 0.92x1.38 smd: 1(-0.955,0) 2(0.955,0)
  silkscreen extent -1,-0.91 1,0.91, body extent -1,-0.63 1,0.63, height 0.6
SODFL1608X65N [mm] "Small Outline Diode Flat Lead (SODFL); 1.20 mm L X 0.80 mm W X 0.65 mm H body"
  rrect50% 0.6x0.4 smd: A(0.75,0) C(-0.75,0)
  silkscreen extent -1.28,-0.43 0.6,0.43, body extent -0.8,-0.4 0.8,0.4, height 0.65
SODFL3617X110 [mm] "Small Outline Diode Flat Lead (SODFL); 2.70 mm L X 1.75 mm W X 1.10 mm H body"
  rrect38% 1.3x1.4 smd: A(1.45,0) C(-1.45,0)
  silkscreen extent -2.28,-1 1.35,1, body extent -1.83,-0.87 1.83,0.87, height 1.1
SOIC127P600X175-8L87N [mm] "Small Outline IC (SOIC), 1.27 mm pitch; 8 pin, 4.90 mm L X 3.90 mm W X 1.75 mm H body"
  rrect50% 0.6x1.97 smd: 1(-1.905,-2.475) 2(-0.635,-2.475) 3(0.635,-2.475) 4(1.905,-2.475) 5(1.905,2.475) 6(0.635,2.475) 7(-0.635,2.475) 8(-1.905,2.475)
  silkscreen extent -2.5,-3.38 2.5,2, body extent -2.45,-3 2.45,3, height 1.75
SOT95P240X110-3L10 [mm] "Small Outline Transistor (SOT23), 0.95 mm pitch; 3 pin, 2.90 mm L X 1.80 mm W X 1.10 mm H body"
  rrect51% 0.9x0.7 smd mask+0.05: 1(1.25,-0.95) 2(1.25,0.95) 3(-1.25,0)
  silkscreen extent -0.95,-1.5 1.64,1.5, body extent -1.2,-1.45 1.2,1.45, height 0.91
SOT95P240X110-3L16 [mm] "Small Outline Transistor (SOT23), 0.95 mm pitch; 3 pin, 2.90 mm L X 1.30 mm W X 1.10 mm H body"
  rrect51% 0.9x0.7 smd: 1(1,-0.95) 2(1,0.95) 3(-1,0)
  silkscreen extent -0.7,-1.5 1.39,1.5, body extent -1.2,-1.45 1.2,1.45, height 1.1
SOT95P280X145-5L30N [mm] "Small Outline Transistor (SOT23), 0.95 mm pitch; 5 pin, 2.90 mm L X 1.60 mm W X 1.45 mm H body"
  rrect50% 1.1x0.55 smd paste-0.05 mask+0.06: 1(1.3,-0.95) 2(1.3,0) 3(1.3,0.95) 4(-1.3,0.95) 5(-1.3,-0.95)
  silkscreen extent -0.88,-1.53 0.88,1.53, body extent -1.4,-1.45 1.4,1.45, height 1.45
SOT230P700X180-4L40N [mm] "Small Outline Transistor (SOT223), 2.30 mm pitch; 4 pin, 6.50 mm L X 3.50 mm W X 1.80 mm H body"
  rrect49% 0.89x1.97 smd: 1(-2.3,-3.025) 2(0,-3.025) 3(2.3,-3.025)
  rrect22% 3.19x1.97 smd: 4(0,3.025)
  silkscreen extent -3.35,-4.46 3.35,1.85, body extent -3.25,-3.5 3.25,3.5, height 1.8

## Part data
BE-880: library part BE-880, "Gate driver", CurrentOutput=±2A, Frequency=1MHz, Temperature=-40...+150°C, VoltageSupply="supply -12...+20V", VoltageWork=1200V, CMTI=100kV/μs
C3: library part "Radial 6.3x11", PartNumber=EEUFR1E101, Voltage=25V, Type="Radial 6.3x11"
C5 C7 C8 C15: library part C1206, PartNumber=GRM31CR61E106KA12L, Voltage=25V, Type=C1206
C6 C11 C18 C19 C20 C21 C22 C23 C24: library part C0603, PartNumber=CL10B104KB8NNNC, Voltage=50V, Type=C0603
C9 C10: library part C0603, PartNumber=CL10C330JB8NNNC,, Voltage=50V, Type=C0603
C13: library part CASEA, PartNumber=293D226X9010A2TE3, Type=CASEA
C16 C17: library part C0603, Type=C0603
D2: library part MCP2515_Mod
D4: library part SQ20953AIC, "Buck converter", CurrentOutput=0.6A, Frequency=2.1MHz, Manufacturer=Silergy, Package=SOT23-8, Temperature=-40...+125°C, VoltageInput="input 4...60V", VoltageOutput="output 0.765...55V", ComponentType="DC/DC buck converter", HelpURL=https://www.chipdip.ru/product/sq20953aic-silergy-8027122657, PartNumber=SQ20953AIC, ValueManufacturerPartNumber="DC/DC buck converter, input 4...60V, 2.1MHz, output 0.765...55V, 0.6A, -40...+125°C, SOT23-8"
DA2: library part TPS763xx, Type=TPL803225-S5TR-S
FU2 FU3 FU4: "Предохраниетель ток срабатывания 1,5А, ток удержания 750мА", Current=1.5A, Manuf=JINRUI
L1: library part MPH0630, PartNumber=MWSA0603S-100MT, Type=MPH0630
R1 R2 R3 R4 R5 R23 R25 R25_PU R26 R26_PU R27 R30 R32 R33 R34 R36 R38 R47: library part R0805, Type=R0805
R11 R12 R13 R15: library part R0603, PartNumber=RC0603FR-07100KL, Type=R0603
R14: library part R0603, PartNumber=RC0603FR-0712KL, Type=R0603
R16: library part R0603, PartNumber=RC0603FR-0733KL, Type=R0603
R24 R28 R29 R31 R45 R46: library part R0603, Type=R0603
R35 R37 R40: library part R0603, PartNumber=RT0603BRD071KL, Type=R0603
R41 R44: library part R0603, PartNumber=RT0603BRD075K1L, Type=R0603
R42 R43: library part R0603, PartNumber=RT0603BRD0710KL, Type=R0603
U: "nRF52832 BLE 4.2/5.0 SMD Wireless Module", Package=Package, Availability=Unavailable, MF=EBYTE, MP=E73-2G4M04S1B, Price=None, SnapEDA_Link=https://www.snapeda.com/parts/E73-2G4M04S1B/EBYTE/view-part/4219264/?ref=snap
VD1: library part LED_single_3mm, Color=Зеленый, ColorParameter=Green, Temperature=-55...+150°C, TypeDiode=LED, ValueManufacturerPartNumber="LED, Green, *, *, *, -55...+150°C"
VD2: library part LED_single_3mm, Color=Желый, ColorParameter=Green, Temperature=-55...+150°C, TypeDiode=LED, ValueManufacturerPartNumber="LED, Green, *, *, *, -55...+150°C"
VD3: library part LED_single_3mm, Color=Красный, ColorParameter=Green, Temperature=-55...+150°C, TypeDiode=LED, ValueManufacturerPartNumber="LED, Green, *, *, *, -55...+150°C"
VD4: library part SS26T3G, Type=SS26T3G
VD5: library part SMAJ-A, Type=SMAJ-A
VD6: library part BAT54, Type=BAT54
VD7 VD14 VD15 VD16 VD17: library part PESDxS1UB, Type=PESDxS1UB
VD10 VD11: library part SMAJ-CA, Type=SMAJ-CA
VD12: library part SMFxxA, Type=SMFxxA
VT2 VT3: library part AO3400, Type=AO3400
X1: library part PLS-4, CurrentMax=3A, Manufacturer=Connfly, VoltageMax=500VAC, CommentText="\"Разъем\"", HelpURL=https://www.chipdip.ru/product/pls-4, Multichannel=4pin, PartNumber=PLS-4, Pitch=2.54mm, TypeConnector=Connector, ValueManufacturerPartNumber="Connector, 4pin, 2.54mm, 500VAC, 3A"
X5: library part 43045-1000, Type=43045-1000
3: Type=LM1117-3.3
DA1: Type=MAX6675ISA+
VD8 VD9: Type=BAT54S
X2: Type=43045-0800

## Free pads (board coordinates)
  round 3 hole 3: 2(4.5,3.5) 2(4.5,66.5) 2(57.5,3.5) 2(57.8,66.7)

## Via types
v1: diameter 0.8, hole 0.4, Top Layer to Bottom Layer, 20 vias
v2: diameter 1.27, hole 0.711, Top Layer to Bottom Layer, 2 vias

## Nets (pads, with @x,y where several pads share a name; then routed paths per layer and width w, separated by ;. In a path a pad name is that pad's centre, name@x,y a point inside that pad or via, vN(x,y) a via of type N, cw(c..) or ccw(c..) an arc to the next point about the centre after c; other vN are vias at no path point)
3,3V: 3.2 3.4 BE-880.5 C13.1 C23.2 C24.2 D1.1 D1.2 D1.6 D2.7 DA1.4 R1.2 R2.2 R3.1 R4.1 R5.1 R25_PU.1 R26_PU.1 R35.2 R37.2 R47.1 U.16 VD8.2 VD9.2 X1.1 | length 287.1
  Top Layer w0.3: R37.2 v1@16.5,46 ; R2.2 28.143,14.998 31.187,14.998 31.385,15.195 31.385,16.026 31.425,16.066 31.425,17.215 D1.1 ; v1(29.9,41.1) 29.95,41.05 29.95,38.95 32.9,36 32.9,35.2 v1(32.991,35.109) ; D1.6@31.13,5.255 D1.6@31.78,5.255 ; R47.1 51.755,40.855 52.555,41.655 R4.1 56.019,41.655 56.368,42.004 D2.7@56.368,42.5
  Top Layer w0.4: R1.2 27.9,6.1 29.12,4.88 D1.6 32.72,4.88 33.775,3.825 33.775,1.725 34,1.5 53.2,1.5 54.8,3.1 54.8,5.6 55.6,6.4 59.966,6.4 60.2,6.634 60.2,15.666 59.966,15.9 57.72,15.9 X1.1 57.9,16.32 57.9,19.175 R5.1@56.98,20.095 ; 37.3,1.5 37.38,1.58 U.16 ; R5.1 56.75,20.095 R5.1@56.98,20.095 ; D2.7 59.22,42.38 60.085,41.515 60.085,20.9 59.23,20.045 R3.1 58.95,20.095 R5.1@56.98,20.095
  Bottom Layer w0.3: R35.2 v1@16.147,45.9 ; v1(16.391,46.009) 17.791,46.009 22,41.8 29.3,41.8 v1@30.009,41.091 ; R25_PU.1 17.542,29.413 R26_PU.1@19.882,29.413 ; R26_PU.1@19.895,29.109 20.306,29.52 VD9.2@23.077,29.52 ; VD9.2 23.17,29.699 23.386,29.914 24.028,30.556 24.569,30.556 26.75,32.737 26.75,37.5 28.01,37.5 29.925,35.585 3.4@29.925,34.15 ; D1.6 30.855,5.085 29.815,5.085 28.4,6.5 28.4,14.7 28.74,15.04 D1.2 D1.1 34.304,17.58 34.748,18.024 34.748,33.873 35.025,34.15 C13.1@35.025,34.2
  Bottom Layer w0.5: DA1.4 11.073,59.952 8.052,59.952 C23.2 8,61.2 15.7,68.9 41.82,68.9 ; BE-880.5@41.82,65.96 41.82,68.9 ; D2.7 59.924,42.38 60.1,42.556 60.1,60.5 51.7,68.9 41.82,68.9
  Bottom Layer w1: 3.2 29.8,28.375 3.4@29.8,34.425 ; 3.4 29.925,34.15 29.94,34.15 30.425,34.635 32.814,34.635 33.124,34.325 ; v1(32.991,35.109) 33.124,34.976 33.124,34.325 ; C13.1@35.025,34.2 34.9,34.325 33.124,34.325
5.6V: 3.3 C7.1 C8.1 C9.1 C10.1 C11.1 DA2.1 DA2.3 L1.2 R11.1 | length 29.6
  Bottom Layer w0.5: R11.1 C9.1@18.495,14.02 ; C9.1@18.751,13.829 18.751,18.501 18.95,18.7 18.95,21.47 20.425,22.945 C10.1 ; C11.1 C10.1 ; DA2.1 26.926,20.676 27.724,20.676 27.9,20.851 27.9,22.374 27.724,22.55 27.29,22.55 DA2.3 ; 27.3,22.95 27.29,22.94 27.29,22.675 27.165,22.55 DA2.3 ; C10.1 20.537,22.888 21.987,22.888 C7.1 22.431,23.106 22.761,22.775 C8.1 24.725,22.55 DA2.3
  Bottom Layer w0.6: 27.3,22.95 27.5,23.15 3.3
5V: C15.1 DA2.5 R40.2 VD12.C | length 44
  Top Layer w0.6: v2(5.8,34.8) 7.6,34.8 11.3,38.5 11.3,40.524 11.476,40.7 15.224,40.7 15.8,40.124 15.8,31.4 v2(28.3,18.9)
  Bottom Layer w0.5: VD12.C 4.125,36.475 5.781,36.475 R40.2@5.853,36.547 ; v2(5.8,34.8) 5.853,34.853 R40.2@5.853,36.547 ; R40.2 R40.2@5.853,36.547
AGND: C18.2 C19.1 C20.1 C21.1 C22.2 C23.1 DA1.1 DA1.2 R34.2 R42.1 R43.1 R45.2 VD12.A VD14.A VD15.A VD16.A VD17.A X5.6 | length 19
  Top Layer w0.3: VD17.A 13.113,51.937 15.488,51.937 C21.1 v1(15.5,54)
  Bottom Layer w0.3: C23.1 8.075,58.175 8.075,57.075 C22.2 ; R45.2 8.9,56.1 8.374,56.626 8.374,56.69 8.314,56.749 8.314,57.187 8.406,57.279 8.602,57.279 8.753,57.43 DA1.2@11.85,57.43 ; X5.6@9.4,39.291 X5.6 ; 15.928,50.158 14.293,50.158 13.6,49.465 R43.1 13.615,49.135 16.51,49.135 C20.1 ; C18.2@16.845,51.075 C18.2
  Bottom Layer w0.8: X5.6 9.4,40.8
GND: 3.1 BE-880.2 C3.2 C5.2 C7.2 C8.2 C10.2 C11.2 C13.2 C15.2 C16.1 C17.2 C24.1 D1.5 D2.6 D4.0 D4.3 D4.4 DA2.2 R12.2 R14.2 R15.2 R16.2 R25.2 R26.1 R30.1 R32.1 R34.1 U.0 U.1 U.2 U.15 U.42 U.43 VD3.2 VD5.A VD7.A VD8.1 VD9.1 VD10.A VD11.A VT2.2 VT3.2 X1.2 X2.5 X2.6 | length 30.4
  Top Layer w0.3: VT3.2@23.15,39.7 VT3.2@23.198,39.652 ; VD11.A@23.988,37.812 VD11.A ; VT2.2@24.405,31.25 24.405,32.718 24.55,32.863 VD11.A@24.55,37.25 ; R30.1 v1(28.055,31.355) ; v1(33.3,23) 33.322,22.978 35.612,22.978 U.2 ; v1(34,5.5) 35.24,5.5 ; U.15@35.24,6.46 35.24,5.5 ; C24.1 35.351,2.624 35.351,2.974 35.24,3.085 35.24,5.5 ; U.42@52.264,25.495 52.124,25.355 51.108,25.355 50.933,25.531 50.933,26.733 53.082,26.733 U.43 ; VD3.2@57.444,26.13 VD3.2
  Top Layer w0.5: VD11.A@24.3,37.3 VD11.A ; VD11.A@24.7,37.58 VD11.A@24.7,37.4 ; VD11.A 24.6,37.4 VD11.A@24.7,37.4 ; VD11.A 24.7,37.3 VD11.A@24.7,37.4
  Bottom Layer w0.3: VD5.A@5.725,12.975 VD5.A ; C3.2@8.075,15.425 C3.2 ; X2.6 9.6,25.7 11.68,25.7 11.78,25.6 11.877,25.698 11.877,27.603 11.975,27.7 ; D4.4 D4.3 ; 17.455,33.3 17.405,33.25 17.405,31.25 R25.2@17.5,31.155 ; R25.2@17.635,32.098 17.635,31.748 R25.2 R25.2@17.73,31.553 ; 18.53,31.155 18.575,31.2
  other v1: 50.9,26.7
NetBE-880_3: BE-880.3 U.23 | length 65.2
  Top Layer w0.3: v1(44.7,10.6) 44.7,8.955 44.975,8.68 44.975,8.625 46.3,7.3 46.3,4.73 U.23
  Bottom Layer w0.3: BE-880.3@36.68,65.9 36.68,45.72 44.7,37.7 v1(44.7,10.6)
NetBE-880_4: BE-880.4 U.21 | length 64.8
  Top Layer w0.3: U.21 43.695,4.735 43.695,7.795 v1(44.3,8.4)
  Bottom Layer w0.3: BE-880.4@39.22,65.9 39.22,43.98 45.775,37.425 45.775,9.875 v1(44.3,8.4)
NetC3_1: C3.1 C5.1 D4.5 FU2.2 VD5.C | length 13.7
  Top Layer w0.7: FU2.2 7.9,11.8 10.408,14.308 10.408,15.208 C3.1
  Bottom Layer w0.7: VD5.C 9.4,12.78 10.6,13.98 C3.1 ; C5.1 VD5.C@9.475,12.855
NetC6_1: C6.1 D4.7 | length 2.9
  Bottom Layer w0.3: D4.7@13.3,11.68 D4.7 13.3,13.075 14.01,13.785 14.033,13.785 14.325,14.077 C6.1@14.325,14.1
NetC6_2: C6.2 D4.6 L1.1 | length 7.1
  Bottom Layer w0.3: L1.1@12.275,18.625 L1.1@12.45,18.8 ; D4.6 12.675,11.725 12.675,14.1 L1.1@12.675,18.525
NetC9_2: C9.2 D4.1 R11.2 R14.1 | length 9.2
  Bottom Layer w0.3: D4.1@13.925,9.287 13.925,7.645 R14.1 13.942,7.62 14.215,7.893 14.215,7.935 16.536,10.256 R11.2@16.536,12.177 ; R11.2 16.974,12.554 17.546,12.554 17.761,12.339 18.36,12.339 C9.2@18.484,12.215
NetC16_2: C16.2 R23.2 R24.1 R25.1 R25_PU.2 VD8.3 | length 23.5
  Bottom Layer w0.3: R25_PU.2 13.74,29.6 13.74,31.245 R23.2@13.492,31.493 ; R25.1@15.617,31.474 14.771,31.474 14.752,31.493 R23.2@13.492,31.493 ; VD8.3@25.5,35.5 25.5,35.4 24.75,34.65 21.86,34.65 20.41,36.1 14,36.1 13.05,35.15 13.05,32.85 13.492,32.408 R23.2@13.492,31.493
NetC17_1: C17.1 R26.2 R26_PU.2 R27.2 R28.1 VD9.3 | length 17.9
  Bottom Layer w0.3: R27.2 15.514,34.1 R26.2 15.589,34.211 15.893,34.515 16.08,34.515 16.865,35.3 18.797,35.3 20.167,33.931 20.167,33.458 C17.1 ; R26_PU.2 20.02,31.337 20.228,31.337 20.3,31.408 20.3,31.597 C17.1@20.3,33 ; R26_PU.2@20.3,31.466 20.429,31.337 20.932,31.337 23.276,33.68 R28.1 24.11,33.67 24.11,31.624 VD9.3 ; C17.1@20.3,33 C17.1@20.3,33.275 ; C17.1@20.3,33 C17.1@20.3,33.275 ; C17.1@20.3,33 C17.1@20.3,33.275 ; C17.1@20.3,33.275 C17.1 ; C17.1@20.3,33.275 C17.1 ; C17.1@20.3,33.275 C17.1
NetC18_1: C18.1 R41.2 R42.2 U.19 VD14.C | length 70.6
  Top Layer w0.3: v1(41.1,8.9) 41.145,8.855 41.145,4.745 U.19
  Bottom Layer w0.3: R41.2 11.95,52.67 13.55,52.67 R42.2 13.67,52.65 VD14.C 16.388,52.65 16.579,52.459 16.845,52.725 C18.1 16.955,52.725 19.8,49.88 19.8,46.2 21.7,44.3 34,44.3 41.1,37.2 v1(41.1,8.9)
NetC19_2: C19.2 R36.2 U.17 | length 59.3
  Top Layer w0.3: v1@18.6,42.975 31.825,42.975 39.825,34.975 39.825,10.125 38.65,8.95 U.17
  Bottom Layer w0.3: R36.2 15.019,43.825 C19.2 17.775,43.825 v1(18.6,43)
NetC20_2: C20.2 R43.2 R44.2 U.20 VD16.C | length 67.2
  Top Layer w0.3: v1(42.014,7.9) 42.014,7.765 42.46,7.319 U.20
  Bottom Layer w0.3: R44.2 11.98,47.5 13.6,47.5 13.665,47.565 15.05,47.565 15.1,47.615 VD16.C ; VD16.C@15.1,47.6 15.2,47.5 C20.2 17.5,47.5 21.6,43.4 33.8,43.4 40.1,37.1 40.1,8.076 40.276,7.9 v1(42.014,7.9)
NetC21_2: C21.2 R38.2 U.18 | length 68.1
  Top Layer w0.3: R38.2 15.116,48.961 15.116,49.372 15.159,49.416 15.159,49.839 15.221,49.902 15.221,50.019 15.477,50.275 C21.2 15.555,50.275 19.78,54.5 22.7,54.5 40.4,36.8 40.4,9.6 40.224,9.424 40.224,5.726 40.17,5.671 40.17,4.95 U.18
NetC22_1: C22.1 DA1.3 R46.2 | length 8.7
  Bottom Layer w0.3: R46.2 6.786,55.386 6.786,56.911 6.875,57 6.875,58.509 7.466,59.1 10.075,59.1 10.49,58.685 DA1.3@11.835,58.685
NetD1_3: D1.3 R2.1 U.5 | length 13.1
  Top Layer w0.25: R2.1 28.361,12.784 31.171,12.784 D1.3@31.48,12.475 ; D1.3@31.645,12.475 31.881,12.475 32.7,13.294 32.7,18 33.845,19.145 U.5
NetD1_4: D1.4 R1.1 U.6 | length 14.5
  Top Layer w0.25: R1.1 29.164,9.255 29.61,9.701 31.246,9.701 33.3,11.755 33.3,17.224 33.951,17.875 U.6
NetD1_10: D1.10 U.7 | length 22.5
  Top Layer w0.2: 29.331,8.3 29.731,8.7 32.583,8.7 32.7,8.817
  Top Layer w0.25: 32.7,8.817 33.9,10.017 33.9,16.2
  Top Layer w0.3: D1.10 22.56,8.3 29.331,8.3 ; 33.9,16.2 34.185,16.485 35.515,16.485 U.7
NetD2_1: D2.1 U.25 | length 57.8
  Top Layer w0.3: U.25 48.81,7.09 46.975,8.925 46.975,47.726 56.82,57.571 56.82,57.62 D2.1
NetD2_2: D2.2 DA1.5 U.27 | length 114.1
  Top Layer w0.3: v1(22.2,57.419) 22.2,60.1 30,67.9 50.076,67.9 58.975,59.001 58.975,57.186 D2.2 47.6,45.811 47.6,9.4 51.107,5.893 51.107,4.943 U.27
  Bottom Layer w0.3: DA1.5 19.614,60.005 v1(22.2,57.419)
NetD2_3: D2.3 U.28 | length 52.6
  Top Layer w0.3: U.28 51.655,6.445 48.2,9.9 48.2,43.871 D2.3
NetD2_4: D2.4 DA1.7 U.29 | length 111.1
  Top Layer w0.3: v1(19.34,57.591) 19.34,58.54 29.7,68.9 49.9,68.9 59.4,59.4 59.4,52.531 D2.4 49,42.131 49,10.3 51.585,7.715 U.29
  Bottom Layer w0.3: DA1.7 16.138,57.528 19.277,57.528 v1(19.34,57.591)
NetD2_5: D2.5 U.39 | length 31.9
  Top Layer w0.3: U.39 51.485,20.415 50.2,21.7 50.2,29 50.8,29.6 50.8,41.391 D2.5
NetD2_8: D2.8 X5.7 | length 15.2
  Top Layer w0.3: X5.7 16.3,42.3 21.9,47.9 D2.8@22.3,47.9
NetD2_9: D2.9 X5.2 | length 22.2
  Top Layer w0.3: X5.2 6.8,42.3 6.8,42.7 7.9,43.8 16.6,43.8 20,47.2 20,50.76 21.64,52.4 D2.9@22.1,52.4
NetD4_2: D4.2 R15.1 | length 1.7
  Bottom Layer w0.3: R15.1 12.52,7.67 13.35,8.5 D4.2@13.35,8.987
NetD4_8: D4.8 R12.1 VD6.3 | length 12.8
  Bottom Layer w0.3: D4.8@13.975,12 14.025,12.05 14.025,12.625 14.507,13.107 14.761,13.107 14.937,13.283 14.937,13.324 15.017,13.404 15.017,13.579 15.258,13.82 R12.1 15.221,13.899 15.221,21.621 16.5,22.9 16.5,23.45 VD6.3
NetDA1_6: DA1.6 U.31 | length 77
  Top Layer w0.3: v1(51.1,10.4) 51.172,10.328 53.023,10.328 U.31
  Bottom Layer w0.3: DA1.6 19.765,58.735 27.682,50.817 30.583,50.817 44,37.4 44,9.2 43.6,8.8 43.6,8.145 44.02,7.725 44.58,7.725 44.655,7.8 48.5,7.8 v1(51.1,10.4)
NetFU2_1: FU2.1 VD4.C | length 4.1
  Top Layer w0.8: FU2.1 3.19,9.69 3.19,10.909 3.3,11.019 3.3,12.515 VD4.C
NetFU3_1: FU3.1 X2.3 | length 9.4
  Top Layer w0.5: X2.3 7.9,30.2 10.224,30.2 11.874,31.85 12.86,31.85 13.6,32.59 FU3.1
NetFU3_2: FU3.2 VD10.C VT2.3 | length 5.5
  Top Layer w0.3: FU3.2 18.8,33.4 VD10.C VD10.C@21.605,32.995 ; VD10.C@21.4,32.6 21.805,32.195 VT2.3@21.805,30.3
NetFU4_1: FU4.1 X2.4 | length 9.7
  Top Layer w0.5: X2.4 9.5,34.8 11.336,36.636 12.66,36.636 13.4,37.376 FU4.1
NetFU4_2: FU4.2 VD11.C VT3.3 | length 9.7
  Top Layer w0.3: FU4.2 18.6,37.5 18.7,37.4 18.8,37.3 VD11.C 21.1,37.366 20.3,38.166 20.3,41.5 21,42.2 VT3.3@22.2,42.2
NetR3_2: R3.2 VD1.1 | length 10.6
  Top Layer w0.25: VD1.1 59.6,29.33 59.6,22.555 59.5,22.455 59.5,22.282 59.173,21.955 R3.2
NetR4_2: R4.2 VD2.1 | length 4.3
  Top Layer w0.3: R4.2 53.83,39.745 54.875,38.7 VD2.1
NetR5_2: R5.2 VD3.1 | length 8
  Top Layer w0.3: R5.2 56.93,22.055 58.625,23.75 58.625,27.645 VD3.1
NetR13_1: R13.1 X2.2 | length 5.9
  Bottom Layer w0.3: X2.2 8.1,24.2 10.244,24.2 10.561,24.517 R13.1@11.583,24.517
NetR13_2: R13.2 R16.1 R33.2 VD6.1 VD7.C | length 8.9
  Bottom Layer w0.3: VD7.C@13.32,23 13.32,23.3 13.37,23.35 R13.2@13.37,24.8 ; R16.1@13.37,27.2 R13.2@13.37,24.8 ; R33.2 15.445,27.3 15.498,27.247 VD6.1@15.498,25.5 ; VD6.1 VD6.1@15.498,25.5 ; R13.2@13.37,24.8 15.352,24.8 15.55,24.998 15.55,25 15.498,25.053 VD6.1@15.498,25.5
NetR23_1: R23.1 X2.7 | length 3.5
  Bottom Layer w0.3: X2.7 9.5,29.1 11.613,31.213 R23.1@11.613,31.416
NetR24_2: R24.2 U.26 | length 66.8
  Top Layer w0.3: U.26 50.09,4.69 50.09,2.41 v1(50.1,2.4)
  Bottom Layer w0.3: R24.2 22.22,39.724 22.396,39.9 25.099,39.9 25.424,39.575 26.875,39.575 27.2,39.9 36.478,39.9 39.472,36.906 39.472,7.828 44.7,2.6 49.765,2.6 49.965,2.4 v1(50.1,2.4)
NetR27_1: R27.1 X2.8 | length 3.6
  Bottom Layer w0.3: X2.8 10.509,32.809 11.447,33.747 11.841,33.747 12.145,34.051 R27.1
NetR28_2: R28.2 U.24 | length 62.9
  Top Layer w0.3: v1(43.2,2.4) 47.3,2.4 47.54,2.64 U.24
  Bottom Layer w0.3: R28.2 24.1,36 23.4,36.7 23.4,38.8 23.7,39.1 36.516,39.1 39.04,36.576 39.04,6.66 v1@43.25,2.45
NetR29_1: R29.1 R30.2 VT2.1 | length 4.2
  Top Layer w0.3: VT2.1@24.425,29.3 26.402,29.3 R30.2@26.244,29.141 ; R30.2 26.722,29.423 28.657,29.423 R29.1
NetR29_2: R29.2 U.9 | length 24.8
  Top Layer w0.3: R29.2 36.5,29.4 38.1,27.8 38.124,27.8 38.3,27.624 38.3,14.241 38.124,14.065 U.9
NetR31_1: R31.1 R32.2 VT3.1 | length 13.5
  Top Layer w0.3: VT3.1@21.25,39.75 21.416,39.916 21.416,40.316 22.1,41 25.7,41 28.21,38.49 28.21,37.5 28.11,37.4 28.924,37.4 29.1,37.224 R31.1
NetR31_2: R31.2 U.11 | length 31.9
  Top Layer w0.3: R31.2 31.945,34.7 35.603,31.043 37.357,31.043 39.4,29 39.4,12.146 38.779,11.525 U.11
NetR33_1: R33.1 U.8 | length 36.1
  Top Layer w0.3: v1(26.2,26) 32.4,26 34.5,28.1 37,28.1 37.7,27.4 37.7,15.511 37.524,15.335 U.8
  Bottom Layer w0.3: R33.1 24.8,27.4 v1(26.2,26)
NetR35_1: R35.1 R36.1 VD15.C X5.3 | length 14.8
  Bottom Layer w0.3: X5.3 6.605,45.095 7.505,45.095 8.7,43.9 10,43.9 12,45.9 R35.1 13.58,45.858 13.339,45.617 13.297,45.617 13.084,45.404 13.084,43.613 13.388,43.309 13.472,43.309 13.57,43.211 13.639,43.211 15.55,41.3 15.65,41.3 15.7,41.25 VD15.C
NetR37_1: R37.1 R38.1 VD17.C X5.8 | length 9
  Top Layer w0.3: X5.8 11.15,45.3 11.75,45.9 11.85,45.9 11.9,45.95 12.684,45.95 ; R38.1 12.684,48.439 12.684,45.95 ; R38.1@13.1,48.855 VD17.C ; R37.1 13.63,45.95 12.684,45.95
NetR40_1: R40.1 X5.1 | length 3.2
  Bottom Layer w0.5: X5.1 7.546,38.154 R40.1
NetR41_1: R41.1 X5.4 | length 6.6
  Bottom Layer w0.3: X5.4 8.1,50 10.908,50 11.585,50.677 11.585,50.707 11.858,50.98 R41.1
NetR44_1: R44.1 X5.9 | length 2.8
  Bottom Layer w0.3: X5.9 9.45,48.35 10.83,48.35 11.485,49.005 11.485,49.047 11.758,49.32 R44.1
NetR45_1: R45.1 X5.10 | length 2.6
  Bottom Layer w0.3: R45.1 8.942,53.68 9.4,53.222 X5.10
NetR46_1: R46.1 X5.5 | length 2.5
  Bottom Layer w0.3: X5.5 6.4,53.402 6.654,53.656 R46.1
NetR47_2: R47.2 U.36 | length 23.1
  Top Layer w0.3: R47.2 49.845,30.304 49.6,30.059 49.6,18.3 51.295,16.605 U.36
NetU_10: U.10 VD6.2 | length 44.9
  Top Layer w0.3: v1(23.4,26.4) 23.4,30.224 23.576,30.4 36.8,30.4 38.9,28.3 38.9,13.7 37.995,12.795 U.10
  Bottom Layer w0.3: VD6.2 17.4,25.585 17.598,25.782 17.682,25.782 17.8,25.9 22.9,25.9 v1(23.4,26.4)
NetU_37: U.37 X1.4 | length 13.7
  Top Layer w0.3: U.37@52.561,17.9 52.794,17.668 54.524,17.668 54.7,17.492 54.7,9.4 55.7,8.4 X1.4
NetU_38: U.38 X1.3 | length 12.2
  Top Layer w0.3: U.38@52.392,19.3 54.5,19.3 55.4,18.4 55.4,11.1 55.64,10.86 X1.3@56.8,10.86
NetU_40: U.40 VD1.2 | length 14.6
  Top Layer w0.3: U.40 53.318,21.908 54.308,21.908 55.7,23.3 55.7,31.97 VD1.2
NetU_41: U.41 VD2.2 | length 15.7
  Top Layer w0.3: U.41 53.271,23.131 54.424,23.131 54.6,23.306 54.6,33.26 VD2.2
NetVD4_A: VD4.A X2.1 | length 6.7
  Top Layer w0.6: VD4.A 3.8,17.385 3.8,20.1 X2.1
pads on no net: BE-880.1 BE-880.6 D1.7 D1.8 D1.9 D1.11 D1.12 D4. DA1.8 DA2.4 U.3 U.4 U.12 U.13 U.14 U.22 U.30 U.32 U.33 U.34 U.35 X2.0 X5.0

## Polygon pours and split planes (outlines as drawn)
GND on Bottom Layer "GND_L02_P007" (solid, pour order 7): 0.1,0 0.1,38.9 19.2,38.9 19.2,63.2 18.7,63.7 1,63.7 1,69.4 1.2,69.6 60.6,69.6 60.6,0.4 60.5,0.3
3,3V on Bottom Layer "3,3V_L02_P000" (solid, pour order 0): 26.8,35.408 36.373,35.408 36.373,32.6 26.8,32.6
NetC3_1 on Bottom Layer "NETC3_1_L02_P001" (solid, pour order 1): 12.1,11.3 11.8,11.3 9.1,11.3 9.1,12.9 12.1,12.9
AGND on Bottom Layer "AGND_L02_P003" (solid, pour order 3): 1.5,39.374 1.6,39.274 18.5,39.274 18.5,62.774 1.42,62.774
GND on Top Layer "GND_L01_P006" (solid, remove dead copper, pour order 6): 0.2,0.1 0.1,0.2 0.1,69.8 60.9,69.8 61,69.9 61,0

## Other copper
Bottom Layer:
  region net 5V: 28.3,18.9 30.5,18.9 31.5,19.9 31.5,20.925 29.028,20.925 28.956,20.853 29.058,20.751 28.778,19.609 28.198,19.257 28.118,19.177
  region net 5.6V: 18.136,20.091 18.136,21.006 20.57,23.44 26.81,23.44 27.381,22.869 27.381,22.327 20.193,22.327 19.634,21.768 19.634,20.32
  region net NetC3_1: 12.1,11.3 11.425,11.3 10.008,9.883 10.008,9.855 9.093,9.855 8.941,10.008 9.017,10.084 9.017,13.487 9.703,13.487 10.287,14.072 10.287,14.961 10.338,14.91 11.481,14.91 11.481,12.804 11.821,12.379 12.1,12.1
  region net NetC6_2: 12.421,11.938 12.446,11.963 12.446,12.294 11.709,13.03 11.709,18.72 13.386,18.72 13.513,18.593 13.407,18.487 13.407,13.644 12.675,12.913 12.827,12.761 12.827,11.913

## Silkscreen, mask and mechanical layers (free items; w line width, h text height)
Top Overlay:
  circle w0.254: c57.8,66.7 r2.6
  circle w0.254: c57.5,3.5 r2.6
  circle w0.254: c4.5,3.5 r2.6
  circle w0.254: c4.5,66.5 r2.6
  region: 438.097,190.103 438.097,189.9 437.894,189.9 437.894,190.103 437.894,190.307 438.097,190.307
  region: 435.252,195.793 435.252,195.59 435.252,195.387 435.049,195.387 435.049,195.59 435.049,195.793 435.049,195.996 435.252,195.996
  text "RACEDAQ" at 37.354,35.754 h1.52
  text "V0.1.0" at 37.202,33.226 h2.5
  text "V" at 60.646,15.454 h1.52 r90
  text "G" at 60.546,12.954 h1.52 r90
  text "DI" at 60.546,9.954 h1.52 r90
  text "CL" at 60.646,6.754 h1.52 r90
Bottom Overlay:
  circle w0.254: c57.8,66.7 r2.6
  circle w0.254: c57.5,3.5 r2.6
  circle w0.254: c4.5,3.5 r2.6
  circle w0.254: c4.5,66.5 r2.6
Board:
  the board outline again, w0.254

## Text inside footprints (layer, text, board x,y; h text height)
BE-880: Top Overlay "C" at 44.717,64.119 h1.4 r180; Top Overlay "D" at 32.057,64.093 h1.4 r180; Top Overlay "G" at 34.557,64.119 h1.4 r180; Top Overlay "T" at 37.097,64.119 h1.4 r180; Top Overlay "R" at 39.637,64.093 h1.4 r180; Top Overlay "V" at 42.226,64.119 h1.4 r180
U: Top Overlay "E73(2G4M04S1BX)" at 45.14,6.986 h2 r90; Top Overlay "GND" at 37.393,22.607 h1; Top Overlay "DEC2" at 37.393,21.337 h1; Top Overlay "DEC3" at 37.393,20.067 h1; Top Overlay "P0.25" at 37.393,18.797 h1; Top Overlay "P0.26" at 37.393,17.527 h1; Top Overlay "P0.27" at 37.393,16.257 h1; Top Overlay "P0.28" at 37.393,14.987 h1; Top Overlay "P0.29" at 37.393,13.717 h1; Top Overlay "P0.30" at 37.393,12.447 h1; Top Overlay "P0.31" at 37.393,11.177 h1; Top Overlay "DEC4" at 37.393,9.907 h1; Top Overlay "DCC" at 37.393,8.637 h1; Top Overlay "DEC1" at 37.393,7.494 h1; Top Overlay "GND" at 37.393,6.097 h1; Top Overlay "P0.13" at 49.204,6.224 h1; Top Overlay "P0.14" at 49.204,7.367 h1; Top Overlay "P0.15" at 49.204,8.637 h1; Top Overlay "P0.16" at 49.204,9.907 h1; Top Overlay "P0.17" at 49.204,11.177 h1; Top Overlay "P0.18" at 49.204,12.447 h1; Top Overlay "P0.19" at 49.204,13.717 h1; Top Overlay "P0.20" at 49.204,14.987 h1; Top Overlay "P0.21" at 49.204,16.257 h1; Top Overlay "SWDCLK" at 47.68,17.527 h1; Top Overlay "SWDIO" at 48.569,18.797 h1; Top Overlay "P0.22" at 49.204,20.067 h1; Top Overlay "P0.23" at 49.204,21.337 h1; Top Overlay "P0.24" at 49.204,22.607 h1; Top Overlay "VCC" at 37.901,24.004 h1 r90; Top Overlay "P0.02" at 39.171,24.004 h1 r90; Top Overlay "P0.03" at 40.441,24.004 h1 r90; Top Overlay "P0.04" at 41.584,24.004 h1 r90; Top Overlay "P0.05" at 42.854,24.004 h1 r90; Top Overlay "P0.07" at 44.124,24.004 h1 r90; Top Overlay "P0.07" at 45.394,24.004 h1 r90; Top Overlay "P0.08" at 46.664,24.004 h1 r90; Top Overlay "P0.09" at 47.934,24.004 h1 r90; Top Overlay "P0.10" at 49.204,24.004 h1 r90; Top Overlay "P0.11" at 50.474,24.004 h1 r90; Top Overlay "P0.12" at 51.624,23.995 h1 r90